# Altium PCB ALUMINUM_BOARD_RO.PcbDoc
Units mil, origin at the board's own origin, x right, y up, seen from the top; angles counter-clockwise.
Board outline 900 x 760 mil, 2 copper layers (Top Layer, Bottom Layer); 7 components, 7 nets, 26 pads, 0 vias.
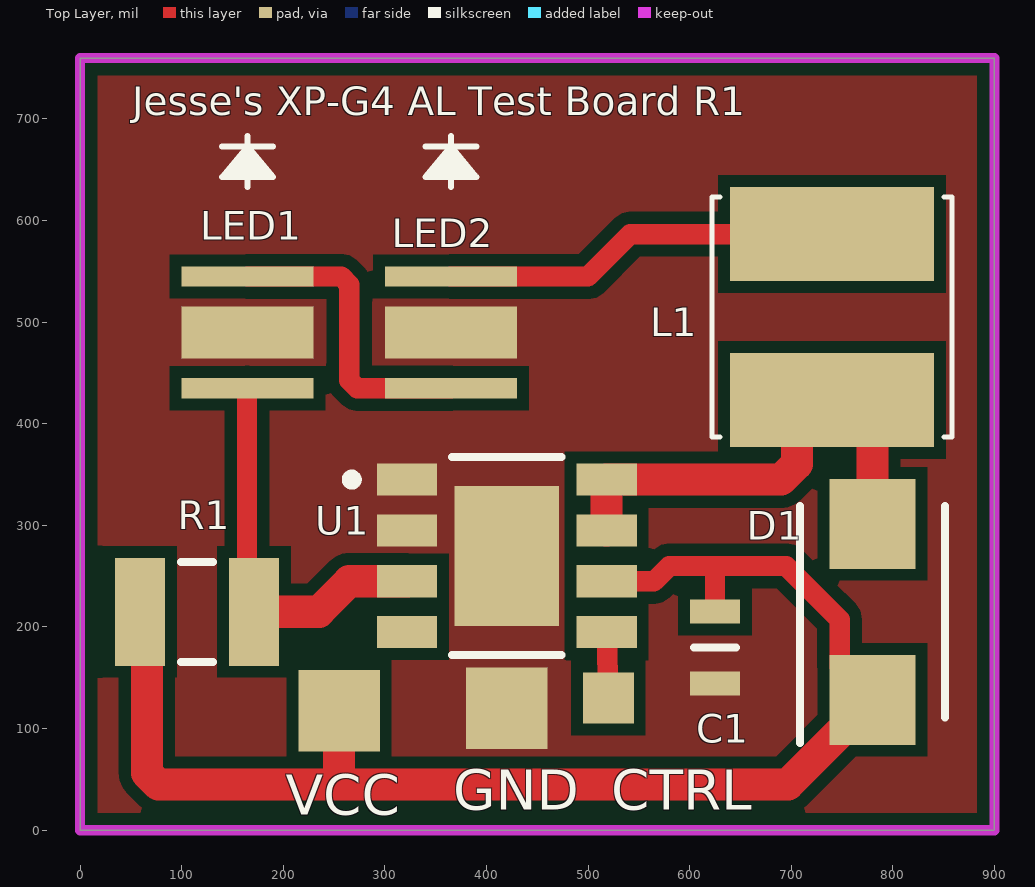
[diagram p0: Top Layer view]
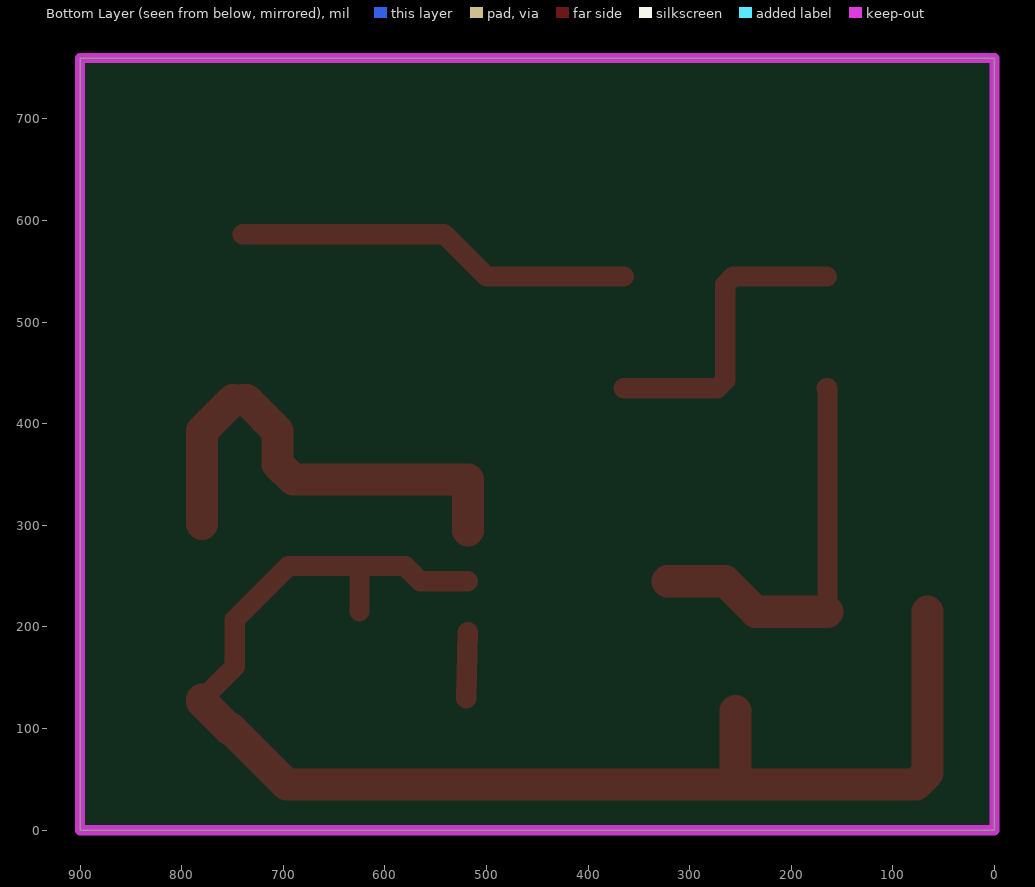
[diagram p1: Bottom Layer view, seen from below]

## Layer stack, top to bottom
Top Solder: solder mask 0.4, Solder Resist, Dk 3.5
Top Layer: signal copper 1.4
Dielectric 1: dielectric 12.6, FR-4, Dk 4.8
Bottom Layer: signal copper 1.4
Bottom Solder: solder mask 0.4, Solder Resist, Dk 3.5

## Board outline
0,0 0,760 900,760 900,0

## Design rules (kind name [scope] priority, off if disabled: settings)
BoardOutlineClearance [All] p1: gap=7.87 ignorepadtopadclearanceinfootprint=FALSE
Clearance "inPolygon Clearance" [InPolygon] p1: gap=12 ignorepadtopadclearanceinfootprint=TRUE // this rule ensures that every net within a polygon of a different net has a set clearance from the poly
Clearance "Different Diff Pair" [All] p2: gap=7.87 ignorepadtopadclearanceinfootprint=TRUE
Clearance "Same Diff Pair" [All] p3: gap=3.94 ignorepadtopadclearanceinfootprint=TRUE
Clearance "Different Nets" [not InAnyDifferentialPair] p4: gap=11.81 ignorepadtopadclearanceinfootprint=TRUE except(3.94: Arc-SMDPad Arc-THPad Arc-Via Arc-Text Track-SMDPad Track-THPad Track-Via Track-Text SMDPad-Text THPad-Text Via-Text Fill-Text Poly-Text Region-Text Text-Text; 4.72: Arc-Arc Arc-Track Track-Track; 5.91: SMDPad-SMDPad SMDPad-THPad SMDPad-Via THPad-THPad THPad-Via Via-Via; 7.87: Arc-Hole Track-Hole SMDPad-Hole THPad-Hole Via-Hole Fill-Hole Poly-Hole Region-Hole Text-Hole)
Clearance "Same Net" [not InAnyDifferentialPair] p5: gap=0 ignorepadtopadclearanceinfootprint=TRUE except(3.94: THPad-Via; 7.09: Arc-Arc Arc-Track Track-Track)
ComponentClearance [All] p1: gap=4 collisioncheckmode=3 verticalgap=4 showdistances=TRUE
DiffPairsRouting "Ethernet Routing" [InDifferentialPairClass('Ethernet_Pairs')] p1: maxlimit=7.87 minlimit=7.87 mostfreqgap=7.87 toplayer_minwidth=9.84 toplayer_maxwidth=9.84 toplayer_prefwidth=9.84 bottomlayer_minwidth=9.84 bottomlayer_maxwidth=9.84 bottomlayer_prefwidth=9.84 impedanceprofiledriven=TRUE maxuncoupledlength=500
DiffPairsRouting "USB Routing" [InDifferentialPairClass('USB_Pairs')] p2: maxlimit=4.99 minlimit=4.99 mostfreqgap=4.99 toplayer_minwidth=9.07 toplayer_maxwidth=9.07 toplayer_prefwidth=9.07 bottomlayer_minwidth=9.07 bottomlayer_maxwidth=9.07 bottomlayer_prefwidth=9.07 maxuncoupledlength=500
DiffPairsRouting "CAN Routing" [InDifferentialPairClass('CAN_Pairs')] p3: maxlimit=19.68 minlimit=19.68 mostfreqgap=19.68 toplayer_minwidth=7.93 toplayer_maxwidth=7.93 toplayer_prefwidth=7.93 bottomlayer_minwidth=7.93 bottomlayer_maxwidth=7.93 bottomlayer_prefwidth=7.93 impedanceprofiledriven=TRUE maxuncoupledlength=500
Height [All] p1: minheight=0 maxheight=71497.94 prefheight=500
HoleSize [All] p1: absolutevalues=TRUE maxlimit=248.03 minlimit=11.81 maxpercent=80.000 minpercent=20.000
HoleToHoleClearance [All] p1: gap=9.84 allowstackedmicrovias=FALSE
MatchedLengths "XTAL Nets Matched Delays" [InNetClass('XTAL_Nets')] p1: tolerance=1000 checknetsindiffpair=FALSE checkdiffpairvsdiffpair=TRUE checkxsignals=TRUE checkothers=TRUE usedelayunits=TRUE delaytolerance=10.000000
MatchedLengths "Diff Pair Matched Delays" [InDifferentialPairClass('Ethernet_Pairs') or InDifferentialPairClass('USB_Pairs') or InDifferentialPairClass('CAN_Pairs')] p2: tolerance=196.85 checknetsindiffpair=TRUE checkdiffpairvsdiffpair=FALSE checkxsignals=FALSE checkothers=FALSE usedelayunits=TRUE delaytolerance=100.000000 phasematching=TRUE phasedelaytolerance=5.000000 phasedistance=500
MinimumAnnularRing [All] p1: minimumring=7.87
MinimumSolderMaskSliver [All] p1: minsoldermaskwidth=0
PlaneClearance "Supply Net Clearance" [InNetClass('Supply_Nets')] p1: clearance=19.68
PlaneClearance "All Nets" [All] p2: clearance=11.81
PlaneConnect [All] p1: planeconnectstyle=Direct reliefexpansion=20 reliefentries=4 reliefconductorwidth=10 reliefairgap=10
PolygonConnect "High Current" [InNetClass('High_Current_Nets')] p1: thpad.connectstyle=Relief thpad.reliefconductorwidth=0.4 thpad.reliefentries=4 thpad.polygonreliefangle="90 Angle" thpad.airgapwidth=0.1 thpad.conductorbypadedge=TRUE thpad.mindistance=15 thpad.enablemindistance=FALSE smdpad.connectstyle=Direct smdpad.reliefconductorwidth=10 smdpad.reliefentries=4 smdpad.polygonreliefangle="90 Angle" smdpad.airgapwidth=10 via.connectstyle=Direct via.reliefconductorwidth=10 via.reliefentries=4 via.polygonreliefangle="90 Angle" via.airgapwidth=10
PolygonConnect [All] p2: connectstyle=Relief reliefconductorwidth=10 reliefentries=4 polygonreliefangle="90 Angle" airgapwidth=10
PolygonConnect General [All] p3: connectstyle=Relief reliefconductorwidth=10 reliefentries=4 polygonreliefangle="90 Angle" airgapwidth=10
RoutingLayers [All] p1: top layer_v5=TRUE bottom layer_v5=FALSE
RoutingVias [All] p1: holewidth=7.87 width=13.78 viastyle="Through Hole" minholewidth=5.91 minwidth=11.81 maxholewidth=248.03 maxwidth=257.87
SilkToSilkClearance [All] p1: silktosilkclearance=0
SilkToSolderMaskClearance [All] p1: minsilkscreentomaskgap=0 clearancetoexposedcopper=TRUE
SolderMaskExpansion [All] p1: expansion=2.95 istentingtop=FALSE
SupplyNets "Schematic Supply Nets_8" [InNet('VCC')] p1: voltage=0.000
SupplyNets "Schematic Supply Nets_3" [InNet('GND')] p2: voltage=0.000
UnRoutedNet [All] p1: checkbadconnections=TRUE
Width "nRF Width" [InNetClass('nRF Signal')] p1: maxlimit=14.94 minlimit=14.94 preferedwidth=14.94 impedanceprofiledriven=TRUE minimp=50.000000 maximp=50.000000 favimp=50.000000 checkconnectedcopper=TRUE
Width [All] p2: maxlimit=3937.01 minlimit=3.94 preferedwidth=7.87
18 further rules are at their usual default settings.

## Classes and differential pairs
net class High_Current_Nets: GND

## Components (designator, comment, footprint, x,y, rotation, side; value= is the part's Value field where it differs from the comment)
C1 "[Cap] 0805 4.7uF 10% 50V" "[Cap] SMD 0805" 625,180 r270 top
D1 "B360B-13-F" DIOM5336X250N 780,215 r90 top
L1 "SRN6045TA-330M" IND_SRN6045TA-330M 740,505 r90 top
LED1 "XPGWHT-01-0000-00DC4" LED_CREE_XPG 165,490 r0 top
LED2 "XPGWHT-01-0000-00DC4" LED_CREE_XPG 365,490 r0 top
R1 "ERJ-L14KF10CU" RESC3225X70X50NL20T20 115,215 r0 top
U1 "AL8843SP-13" FP-SO-8EP-MFG 420,270 r0 top

## Footprints (in the part's own frame and the unit in brackets; to place one, negate y for a bottom-side part, rotate by r counter-clockwise, add the part's x,y. Pads: shape width x height; smd on the part's side, far side on the other; paste and mask are expansions set on the pad)
"[Cap] SMD 0805" [mm]
  rect 0.6x1.25 smd: 1(-0.9,0) 2(0.9,0)
  silkscreen extent 0,-0.53 0,0.53, body extent -1,-0.63 1,0.63, height 1
DIOM5336X250N [mm]
  rect 2.25x2.15 smd: 1(-2.2,0) 2(2.2,0)
  silkscreen extent -3.27,-1.81 2.65,1.81
FP-SO-8EP-MFG [mm]
  rect 1.505x0.802 smd paste+0 mask+0: 1(-2.498,1.905) 2(-2.498,0.635) 3(-2.498,-0.635) 4(-2.498,-1.905) 5(2.497,-1.905) 6(2.497,-0.635) 7(2.497,0.635) 8(2.497,1.905)
  rect 2.613x3.502 smd paste+0 mask+0: 9(0,0)
  silkscreen extent -4,-2.47 1.37,2.47, body extent -3.35,-2.58 3.35,2.58, height 0.25
IND_SRN6045TA-330M [mm]
  rect 2.35x5.1 smd: 1(-2.075,0) 2(2.075,0)
  silkscreen extent -3,-3 3,3, body extent -3,-3 3,3, height 4.5
LED_CREE_XPG [mil]
  rect 130x20 smd paste+0 mask+0: 1(0,55) 3(0,-55)
  rect 130x51 smd paste+0 mask+0: 2(0,0)
  silkscreen extent -25,143 25,193
RESC3225X70X50NL20T20 [mm] "Chip Resistor, 2-Leads, Body 3.20x2.50mm, IPC Medium Density"
  rect 1.25x2.7 smd: 1(-1.425,0) 2(1.425,0)
  silkscreen extent -0.4,-1.25 0.4,1.25, body extent -1.7,-1.35 1.7,1.35, height 0.7

## Part data
C1: "GRT21BR61H475KE13L", Capacitance=4.7uF, Max Voltage=50V, Size Package=0805, Supplier Part Number 1=490-12394-1-ND, Tolerance=10%, Supplier 1=DigiKey
D1: "Diodes Inc B360B-13-F, SMT Schottky Diode, 60V 3A, 2-Pin DO-214AA", Manufacturer_Name="Diodes Incorporated", Mouser Part Number=621-B360B-F, Arrow Part Number=B360B-13-F, Arrow Price/Stock=https://www.arrow.com/en/products/b360b-13-f/diodes-incorporated?region=europe, Datasheet Link=https://www.diodes.com/assets/Datasheets/ds30924.pdf, Geometry.Height=2.5mm, Manufacturer_Part_Number=B360B-13-F, Mouser Price/Stock=https://www.mouser.co.uk/ProductDetail/Diodes-Incorporated/B360B-13-F?qs=cDbtHnkTFqtfpDEkSTc71A%3D%3D
L1: "Inductors, Fixed, 33uH 20% 1.5A shd SMD AEC-Q200", Package="Nonstandard Bourns", Check_prices=https://www.snapeda.com/parts/SRN6045TA-330M/Bourns/view-part/?ref=eda, MF=Bourns, MP=SRN6045TA-330M, SnapEDA_Link=https://www.snapeda.com/parts/SRN6045TA-330M/Bourns/view-part/?ref=snap
LED1 LED2: "No Description Available", Manufacturer_Name="Cree LED", VALUE_2=Value, Copyright="Copyright (C) 2026 Ultra Librarian. All rights reserved.", Manufacturer_Part_Number=XPGWHT-01-0000-00DC4
R1: library part CMP-2005-03838-2, Manufacturer=Panasonic, Part Number=ERJ-L14KF10CU
U1: library part CMP-12753-000007-1, "IC LED MV INT SWITCH SO-8EP", Ambient Temperature Range High=+105°C, Ambient Temperature Range Low=-40°C, Manufacturer="Diodes Inc.", Max Junction Temp=+125°C, Max Supply Voltage=40V, Min Supply Voltage=4.5V, Nominal Supply Current=0.35mA, Output Current=3A, Output Voltage=36V, Package=SO-8EP, Switching Frequency=1MHz, Temperature="-40°C to +125°C", Automotive=No, Category=IC, ComponentLink2Description=Datasheet, ComponentLink2URL=https://www.diodes.com/assets/Datasheets/AL8843.pdf, Device Class L1="Integrated Circuits (ICs)", Device Class L2="Power Management ICs", Device Class L3="LED Drivers", Digikey Description="IC LED MV INT SWITCH SO-8EP", Dimming=Analog,PWM, Footprint Url=https://www.diodes.com/assets/Package-Files/SO-8EP.pdf, Height=1.63mm, Ipc Land Pattern Name=SOP127P600X163-8, Lead Free=Yes, Manufacturer Part Number=AL8843SP-13, Number Of Outputs=1, Octopart=https://octopart.com/al8843sp-13-diodes+inc.-88289989, RoHS=TRUE, Standoff Height=0mm, Switching Topology=Buck, Temperature Range High=+125°C, Temperature Range Low=-40°C

## Free pads (board coordinates)
  rect 80x80 smd: 9(255,117.5) 10(420,120)
  rect 50x50 smd: 11(520,130)

## Nets (pads, with @x,y where several pads share a name; then routed paths per layer and width w, separated by ;. In a path a pad name is that pad's centre, name@x,y a point inside that pad or via, vN(x,y) a via of type N, cw(c..) or ccw(c..) an arc to the next point about the centre after c; other vN are vias at no path point)
CONTROL: pad.11 U1.5 | length 65
  Top Layer w20: U1.5 pad.11
GND: C1.2 LED1.2 LED2.2 pad.10 U1.1 U1.2 U1.9
NetD1_2: D1.2 L1.1 U1.7 U1.8 | length 457.4
  Top Layer w31.57: U1.7 U1.8 690,345 705.5,360.5 705.5,392.84 735.97,423.31 L1.1 ; L1.1@749.53,423.31 780,392.84 D1.2
NetL1_2: L1.2 LED2.1 | length 392.3
  Top Layer w20: LED2.1 500,545 541.69,586.69 L1.2
NetLED1_1: LED1.1 LED2.3 | length 300.7
  Top Layer w20: LED1.1 257.07,545 265,537.07 265,442.93 272.93,435 LED2.3
SET: LED1.3 R1.2 U1.3 | length 390.6
  Top Layer w20: R1.2@164.26,215 164.26,435 LED1.3
  Top Layer w31.57: R1.2@164.26,215 235,215 265,245 U1.3
VCC: C1.1 D1.1 pad.9 R1.1 U1.6 | length 1380.1
  Top Layer w20: U1.6 565,245 580,260 625,260 ; C1.1 625,260 ; D1.1 747.68,160.71 747.68,207.32 745,210 695,260 625,260
  Top Layer w31.57: R1.1@65.74,215 65.74,56.32 77.06,45 255,45 ; pad.9 255,45 ; D1.1 780,126.42 753.46,99.88 751.5,99.88 696.61,45 255,45
pads on no net: U1.4

## Polygon pours and split planes (outlines as drawn)
GND on Top Layer "GND_POUR" (solid, pour order 1): 900,760 0,760 0,0 900,0

## Keep-outs
Keep-Out Layer:
  the board outline again, w10

## Silkscreen, mask and mechanical layers (free items; w line width, h text height)
Top Overlay:
  text "Jesse's XP-G4 AL Test Board R1" at 51.46,703.67 h28
  text "GND" at 367.52,20.32 h39.37
  text "CTRL" at 522.84,20.32 h39.37
  text "VCC" at 202.52,15.32 h39.37